# Altium PCB TYPEC_4KRECEIVER-v1.0.PcbDoc (part 11 of 12)
Units mil, origin at the board's own origin, x right, y up, seen from the top; angles counter-clockwise.
Board outline 2834.7 x 1259.84 mil, 10 copper layers (Top Layer, GND-1, Signal L1, GND-2, PWR-1, PWR-2, GND-3, Signal L2, GND-4, Bottom Layer), stack 61.686 mil thick; 492 components, 339 nets, 2214 pads, 1169 vias.
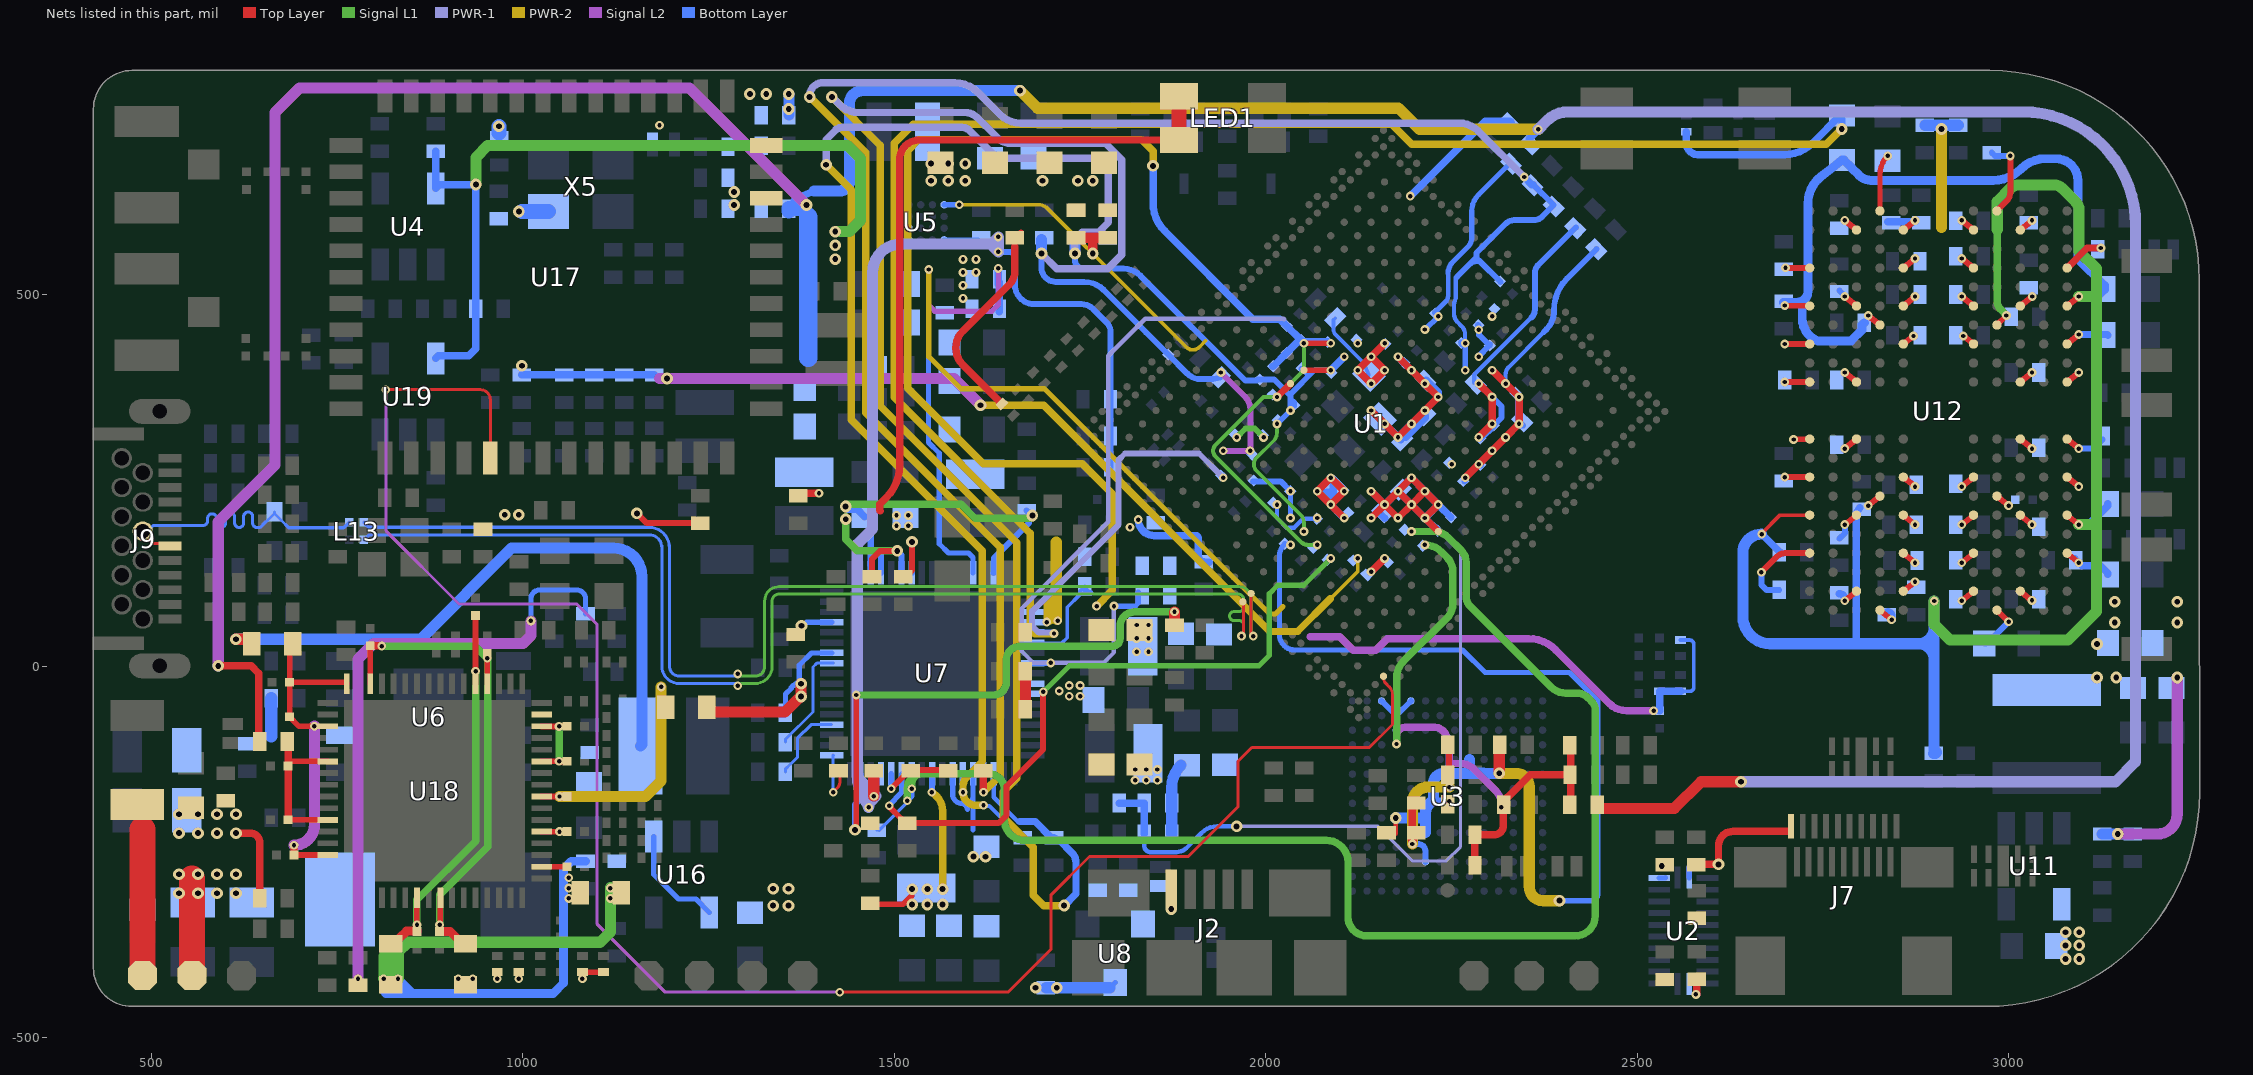
[diagram p16: the nets of this part, all layers, seen from the top]

## Via types
v1: diameter 11.81, hole 5.91, Top Layer to Bottom Layer, tented both sides, 698 vias
v2: diameter 15.75, hole 7.87, Top Layer to Bottom Layer, tented both sides, 248 vias
v3: diameter 11.81, hole 5.91, Top Layer to Signal L1, tented both sides, 121 vias
v4: diameter 11.81, hole 5.91, Top Layer to Bottom Layer, 44 vias
v5: diameter 11.81, hole 5.91, Signal L2 to Bottom Layer, 41 vias
v6: diameter 11.81, hole 5.91, Top Layer to Signal L1, 17 vias

## Nets (pads, with @x,y where several pads share a name; then routed paths per layer and width w, separated by ;. In a path a pad name is that pad's centre, name@x,y a point inside that pad or via, vN(x,y) a via of type N, cw(c..) or ccw(c..) an arc to the next point about the centre after c; other vN are vias at no path point) (continued)
USB_D_P: D29.1 J9.A6 J9.B6 L13.4 | length 435
  Top Layer w4.1: J9.B6@488.73,181.29 488.73,179.08 502.85,164.96 524,164.96 J9.A6@527.36,161.61
  Bottom Layer w4.1: J9.B6@488.73,181.29 495.24,181.29 503.26,189.31 567.98,189.31 570.03,189.31 ccw(c570.03,195.36) 576.08,195.36 576.08,198.83 cw(c582.13,198.83) 588.18,198.83 588.18,192.49 ccw(c594.23,192.49) 600.28,192.49 600.28,200.47 cw(c606.33,200.47) 612.38,200.47 612.38,192.49 ccw(c618.43,192.49) 624.48,192.49 624.48,201.3 cw(c630.53,201.3) 636.58,201.3 636.58,192.49 636.79,190.9 ccw(c642.63,192.49) 642.63,186.44 646.71,186.44 653.73,193.46 656.85,196.58 657.18,196.58 D29.1@665.96,205.36 ; D29.1@665.96,207.53 D29.1@665.96,205.36 ; L13.4@766.55,193.49 759.17,186.11 685.29,186.11 674.81,196.58 674.74,196.58 D29.1@665.96,205.36
USB_OTG0_D_N: L13.1 U1.R38 | length 1610
  Top Layer w4.1: v3(1967.54,40.27) ccw(c1967.54,43.18) 1968.54,40.45 ccw(c1967.54,43.18) 1970.44,43.18 1970.44,85.41 U1.R38@1969.44,86.41
  Signal L1 w4: v4(1289.66,-26.43) cw(c1292.56,-26.43) 1292.56,-23.53 1313.27,-23.53 ccw(c1313.27,-1.12) 1335.68,-1.12 1335.68,87.29 cw(c1345.21,87.29) 1345.21,96.82 1963.04,96.82 cw(c1963.04,89.42) 1970.44,89.42 1970.44,79.33 cw(c1964.39,79.33) 1964.39,73.28 1957.6,73.28 ccw(c1957.6,67.23) 1957.6,61.18 1964.39,61.18 cw(c1964.39,55.13) 1970.44,55.13 1970.44,43.18 cw(c1967.54,43.18) v3(1967.54,40.27)
  Bottom Layer w4.1: L13.1@786.24,169.87 790.1,173.73 790.86,173.73 793.77,176.63 1169.43,176.63 cw(c1169.43,172.53) 1169.71,176.62 1172.67,176.44 cw(c1172.42,172.35) 1173.08,176.4 cw(c1170.25,159.42) 1187.2,162.36 cw(c1183.16,161.64) 1187.26,161.9 1187.45,158.88 cw(c1183.35,158.63) 1187.45,158.63 1187.45,5.33 ; 1187.45,4.97 1187.45,-0.19 ccw(c1210.84,-0.19) 1210.84,-23.58 1286.8,-23.58 cw(c1286.8,-26.43) v4(1289.66,-26.43)
USB_OTG0_D_P: L13.2 U1.R37 | length 1610.1
  Top Layer w4.1: U1.R37@1980.58,97.55 1980.58,43.04 ccw(c1983.35,43.04) v3(1983.35,40.27)
  Signal L1 w4: v4(1289.66,-10.62) ccw(c1292.56,-10.62) 1292.56,-13.53 1313.27,-13.53 ccw(c1313.27,-1.12) 1325.68,-1.12 1325.68,87.29 cw(c1345.21,87.29) 1345.21,106.82 1964.33,106.82 cw(c1964.33,90.71) 1980.44,90.71 1980.44,43.18 ccw(c1983.35,43.18) v3(1983.35,40.27)
  Bottom Layer w4.1: L13.2@786.24,193.49 790.1,189.64 790.1,189.13 792.5,186.73 1169.43,186.73 cw(c1169.43,172.53) 1170.35,186.7 1173.29,186.52 cw(c1172.42,172.35) 1174.72,186.36 cw(c1170.25,159.42) 1197.15,164.1 cw(c1183.16,161.64) 1197.34,162.53 1197.53,159.51 cw(c1183.35,158.63) 1197.55,158.63 1197.55,-0.19 ccw(c1210.84,-0.19) 1210.84,-13.48 1286.8,-13.48 ccw(c1286.8,-10.62) v4(1289.66,-10.62)
VCC0V6_DDR: C109.2 C111.2 C113.2 C115.2 C117.2 C179.2 C198.2 C200.2 C202.2 C205.1 C207.2 C209.2 C211.2 C213.2 C215.2 C218.2 C221.2 C223.2 C225.2 C227.2 C229.2 C233.2 C237.2 C242.2 C249.2 C250.2 C254.2 C255.2 C256.2 C300.2 L10.2 R98.1 R100.2 R102.2 R103.2 U1.1E6 U1.1E7 U1.1E9 U1.1F5 U1.1G5 U12.AA3 U12.AA5 U12.AA8 U12.AA10 U12.B3 U12.B5 U12.B8 U12.B10 U12.D1 U12.D5 U12.D8 U12.D12 U12.F3 U12.F10 U12.U3 U12.U10 U12.W1 U12.W5 U12.W8 U12.W12 | length 1639.8
  Top Layer w8: v1(2667.36,126.31) 2688.55,147.5 cw(c2699.16,136.9) 2699.16,151.9 U12.W1@2732.35,151.9 ; v1(2699.72,536.05) 2699.87,535.91 2732.21,535.91 U12.D1@2732.35,535.76 ; v1(2779.6,87.92) U12.AA3@2795.34,100.72 ; v1(2779.6,190.28) U12.U3@2795.35,203.08 ; v1(2779.6,497.37) U12.F3@2795.34,484.58 ; v1(2779.6,599.73) U12.B3@2795.34,586.94 ; U12.AA5@2858.34,100.72 v1(2874.09,113.49) ; U12.W5@2858.34,151.9 v1(2874.09,139.1) ; U12.D5@2858.34,535.76 v1(2874.09,548.51) ; U12.B5@2858.34,586.94 v1(2874.09,599.73) ; v1(2937.08,87.92) U12.AA8@2952.82,100.72 ; v1(2937.08,139.1) U12.W8@2952.82,151.9 ; v1(2937.08,548.55) U12.D8@2952.82,535.76 ; v1(2937.08,599.73) U12.B8@2952.82,586.94 ; U12.AA10@3015.82,100.72 v1@3031.15,88.26 ; U12.U10@3015.82,203.08 v1(3031.57,190.28) ; U12.F10@3015.82,484.58 v1@3031.57,497.37 ; U12.B10@3015.82,586.94 v1(3031.57,599.73) ; U12.W12@3078.81,151.9 v1(3094.56,139.1)
  Top Layer w10: v1(2286.8,307.73) 2300.5,321.43 ccw(c2289.9,332.04) U1.1E6@2303.76,326.3 ; v1(2286.8,380.11) v1(2304.9,362.02) ; U1.1E6@2304.05,326.18 2304.74,326.18 2305.24,326.68 U1.1F5@2305.24,361.68 ; U12.D12@3078.81,535.76 3105.64,562.58 v1(3124.31,562.58)
  PWR-2 w15: 2909.86,590.4 v2(2909.86,722.86)
  Signal L2 w15: v2(3146.9,-226.14) 3199.96,-226.14 ccw(c3200.01,-199.16) 3226.98,-199.77 3226.98,-199.64 v2(3226.98,-15.49)
  Bottom Layer w5.7: C115.2@2280.68,392.04 2357.96,469.32
  Bottom Layer w6: C115.2@2280.68,381.04 C115.2@2280.68,391.44
  Bottom Layer w8: v1(2286.8,380.11) 2317.5,349.41 2317.5,334.37 C109.2@2308.95,325.83 ; v1(2304.9,325.83) C109.2@2308.95,325.83 ; C109.2@2308.59,325.46 C109.2@2308.95,325.83 ; 2357.96,469.32 2358.39,469.75 ccw(c2348.8,479.33) 2362.36,479.33 2362.36,528.81 cw(c2377.36,528.81) 2366.74,539.41 C117.2@2417.81,590.48 ; v1(2667.36,126.31) 2667.36,109.27 2674.1,102.53 C202.2@2691.36,102.53 ; C207.2@2772.36,171.27 2779.86,178.77 2779.86,190.03 v1(2779.6,190.28) ; C229.2@2772.36,505.49 2779.6,498.24 v1(2779.6,497.37)
  Bottom Layer w10: v1(2286.8,307.73) C111.2@2290.57,307.73 ; C111.2@2289.85,307.01 C111.2@2290.57,307.73 ; C109.2@2305.63,324.1 C109.2@2305.98,324.1 ; C109.2@2306.3,324.42 2306.46,324.27 2306.46,323.62 C111.2@2290.57,307.73 ; C237.2@2772.36,97.07 cw(c2772.36,89.82) 2779.6,89.82 v1(2779.6,87.92) ; C227.2@2837.36,597.99 2872.34,597.99 v1(2874.09,599.73) ; C221.2@3088.81,144.66 C221.2@3095.18,138.29 ; v1(3094.56,139.1) C221.2@3095.05,139.1 ; C221.2@3099.02,135.13 3123.66,135.13 3133.66,125.13 C255.2@3133.66,123.3
  Bottom Layer w15: R103.2@2887.36,727.86 R102.2@2932.36,727.86 ; C254.2@3126.19,-226.07 R100.2@3167.35,-226.06
  other v1: 3031.57,88.3 2250.61,271.54 3031.97,497.37
  other v2: 3118.98,-15.49 3144.98,-15.49 3226.98,58.51 3226.98,86.51
VCC1V8_DDR: C230.2 C231.2 C234.2 C235.2 C239.2 C240.2 C243.2 C244.2 R99.2 R104.2 U12.F1 U12.F12 U12.G4 U12.G9 U12.T4 U12.T9 U12.U1 U12.U12 | length 3251.2
  Top Layer w5: v1(2667.76,177.49) 2667.76,178.44 2692.4,203.08 U12.U1@2732.36,203.08
  Top Layer w8: v1(2698.81,485.23) 2699.14,484.9 2732.03,484.9 U12.F1@2732.35,484.58 ; v1(2811.1,215.87) U12.T4@2826.84,228.67 ; v1(2811.1,471.78) U12.G4@2826.84,458.99 ; U12.T9@2984.32,228.67 v1(3000.07,215.87) ; U12.G9@2984.32,458.99 v1(2997.16,471.78) ; U12.U12@3078.81,203.08 v1(3094.56,190.28) ; U12.F12@3078.81,484.58 v1(3094.56,497.37)
  Signal L1 w10: 2984.86,587.4 2984.86,490.71 ccw(c2999.86,490.71) 2989.24,480.11 2997.16,472.19 v1(2997.16,471.78)
  Signal L1 w15: v1(2899.86,87.53) 2899.86,56.26 2921.02,35.1 3079.93,35.1 3118.16,73.34 3118.16,190.28 ; 2984.86,587.4 2984.86,625.03 3002.97,643.14 cw(c3013.57,632.53) 3013.57,647.53 3061.14,647.53 cw(c3061.14,632.53) 3071.74,643.14 3090.47,624.42 cw(c3079.86,613.82) 3094.86,613.82 3094.86,558.09 3118.16,534.78 3118.16,497.37 ; v1(3094.56,190.28) 3118.16,190.28 ; v1(3094.56,497.37) 3118.16,497.37 ; 3118.16,190.28 3118.16,497.37
  Bottom Layer w8: v1@2667.36,177.49 v1@2668.16,177.49
  Bottom Layer w10: v1@2668.16,177.49 C235.2@2692.82,152.83 ; 2793.14,30.03 2794.86,31.74 2794.86,200.72 cw(c2811.93,200.72) C243.2@2799.86,212.79 ; v1(3094.56,190.28) 3106.97,190.28 3122.47,205.78 3123.66,205.78 3133.66,215.78 C230.2@3133.66,218.28
  Bottom Layer w12: C240.2@2697.36,489.53 C240.2@2698.81,489.53 ; v1(2698.81,485.23) C240.2@2698.81,489.53 ; 2722.36,489.53 2722.36,468.11 ccw(c2755.35,468.11) 2743.2,437.44 2787.77,437.44 2802.86,452.52 2802.86,459.03 C244.2@2805.86,462.03 ; R104.2@2775.86,681.03 2763.36,671.03 2747.66,658.85 ccw(c2775.86,622.5) 2729.86,622.5 2729.86,503.93 cw(c2715.46,503.93) 2715.46,489.53 C240.2@2698.81,489.53 ; R104.2@2778.36,681.03 2788.36,671.03 2788.36,670.8 2798.88,660.28 ccw(c2814.86,676.26) 2814.86,653.66 2979.34,653.66 ccw(c2979.34,706.59) 3016.76,669.17 cw(c3049.52,636.41) 3049.52,682.73 3063.98,682.73 cw(c3063.98,653.4) 3084.7,674.16 ; 3084.72,674.14 cw(c3063.98,653.4) 3093.32,653.4 3093.32,547.98 3129.17,512.13 C231.2@3129.17,507.52 ; v1(3094.56,497.37) 3112.8,497.37 ccw(c3112.8,512.37) 3123.41,501.76 C231.2@3129.17,507.52 ; C231.2@3129.17,506.99 C231.2@3129.17,507.52 ; C231.2@3129.21,507.57 C231.2@3129.17,507.52
  Bottom Layer w15: v1@2667.36,177.49 ccw(c2667.36,152.49) 2642.36,152.49 2642.36,66.96 ccw(c2679.29,66.96) 2679.29,30.03 2793.14,30.03 2878.64,30.03 ; R99.2@2899.07,-117.63 2901.36,-117.63 R99.2@2902.86,-116.13 ; R99.2@2899.86,-116.13 2899.86,8.82 ; v1(2899.86,87.53) 2899.86,51.24 ; 2878.64,30.03 cw(c2878.64,8.82) 2899.86,8.82 ; 2878.64,30.03 ccw(c2878.64,51.24) 2899.86,51.24 ; 2899.86,8.82 2899.86,51.24
VCC3V3_PMU: C20.2 C118.2 C123.2 R6.1 R7.1 R12.2 R22.1 R109.1 U1.1N15 U1.1P16 U7.31 | length 1774.4
  Top Layer w8: R12.2@1661.09,575.24 R12.2@1662.36,576.53 ; R12.2@1662.36,576.53 1665.86,576.53 1670.86,581.53 R12.2@1670.86,583.76
  Top Layer w10: R22.1@1645.16,352.77 1592.48,405.44 cw(c1615.31,428.27) 1583.03,428.27 cw(c1614.68,428.27) 1592.28,450.63 1655.08,513.44 ccw(c1637.14,531.36) 1662.51,531.36 1662.51,563.88 1662.36,564.03
  Top Layer w15: v1@1472.68,-175 C20.2@1472.68,-140.76
  Signal L1 w8: v1(1961.09,307.73) 1972.96,319.6 1985.41,319.6 v1(1997.28,307.73)
  PWR-1 w15: v1@1463.73,-185.34 cw(c1510.41,-147.77) 1450.48,-147.77 ; v1(1465.73,-190.34) cw(c1477.88,-190.34) 1469.28,-181.75 ; 1469.29,-181.74 1475.86,-175.17 1460.27,-159.59 1451.92,-151.24 cw(c1455.39,-147.77) 1450.48,-147.77 ; 1632.36,565.49 v1(1640.32,557.53) v1@1640.32,575.07 ; 1632.36,568.03 1509.52,568.03 ccw(c1509.52,529.61) 1471.11,529.61 1471.11,184.6 1450.48,163.97 1450.48,-147.77 ; 1632.36,569.57 v1(1640.32,577.53)
  Bottom Layer w8: v1(1640.32,557.53) 1654.21,557.53 cw(c1654.21,549.23) 1662.51,549.23 1662.51,513.5 1662.51,513.44 ccw(c1689.14,513.44) 1675.75,490.41 ccw(c1688.24,511.9) 1688.24,487.05 1752.32,487.05 cw(c1752.32,465.64) 1767.46,480.78 ; 1767.49,480.74 1786,462.24 ; 1786.02,462.22 cw(c1773.5,449.73) 1791.18,449.73 R109.1@1791.18,358.97 R7.1@1791.18,309.58 R6.1@1791.18,267.26
  other v1: 1472.86,-175.17
VCC3V3_SD: C25.2 U7.58 | length 90.9
  Top Layer w8: C25.2@1512.35,120.1 1515.85,120.1 1524.11,128.35 v2(1524.11,167.08)
  Bottom Layer w8: U7.58@1523.71,125.27 1523.91,125.47 1523.91,161.88 v2@1524.11,162.08
VCC3V3_SYS: C8.2 C14.2 C18.2 C22.2 C26.2 C30.2 C32.2 C65.1 C66.1 C67.2 C68.2 C81.2 C82.2 C196.2 C290.2 FB7.1 FB8.1 L12.2 LED1.2 LED1.4 R32.1 R112.2 R119.2 R121.2 R132.1 TP7.1 U7.4 U7.10 U7.11 U7.22 U7.24 U7.30 U7.45 U7.54 U7.57 U7.66 U11.4 U16.1 U16.4 | length 3438.4
  Top Layer w7: R121.2@1080.45,-412.12 R112.2@1109.06,-412.12
  Top Layer w8: C22.2@1470.43,120.26 1470.43,144.28 1481.15,155 v2(1504.24,155) ; v1@1496.07,-164.83 1514.18,-146.72 1514.18,-145.76 1520.04,-139.9 C14.2@1575.63,-139.9
  Top Layer w10: 1481.18,208.66 1480.51,209.34 1480.51,217.62 1489.46,226.57 ccw(c1446.27,269.76) 1507.35,269.76 1507.35,681.05 cw(c1534.3,681.05) 1534.3,708 LED1.2@1883.6,708
  Top Layer w15: FB7.1@1248,-55.58 1254.48,-62.06 1352.95,-62.06 v2@1373.86,-41.15 ; FB7.1@1252.31,-53.27 FB7.1@1252.31,-47.89 ; v2@1374.83,-41.15 v2(1374.83,-23.84)
  Top Layer w20: LED1.2@1883.6,708 LED1.4@1883.6,767.06
  Top Layer w35: TP7.1@555.11,-416.63 555.11,-285.89
  Signal L1 w10: v2@1434.79,200.61 1434.79,170.86 1450.65,155 v2(1504.24,155) v2@1505.4,155 ; v2@1434.79,217.62 1590.33,217.62 1608.84,199.11 v2@1684.62,199.11
  PWR-2 w15: v1@1708.47,62.41 1708.47,81.65 1717.8,90.98 1717.8,91.33 ; v1@1718.15,63.26 1718.15,90.98 1718.15,166.58
  Signal L2 w15: v4(778.4,-420.79) 778.4,9.58 799.16,30.34 1000.53,30.34 1011.1,40.91 v5(1011.1,60.7)
  Bottom Layer w7: v5(1011.1,60.7) 1011.1,90.33 cw(c1023.02,90.33) 1023.02,102.25 1072.91,102.25 cw(c1072.91,90.56) 1084.6,90.56 R32.1@1084.6,70.31 ; U16.1@1176.49,-229.41 1176.49,-280.55 1209.61,-313.67 1233.19,-313.67 U16.4@1251.29,-331.77 ; C32.2@1353.68,-62.77 1353.68,-37.88 1361.47,-30.09 1361.47,-28.95 1363.99,-26.44 1365.13,-26.44 1372.26,-19.3 1372.26,1.05 1388.79,17.59 U7.45@1416.03,17.59 ; U7.24@1578.83,-145.21 1578.83,-157.95 1578.83,-172.6 ccw(c1591.25,-172.61) 1589.68,-184.93 ccw(c1590.4,-178.97) 1590.35,-184.97 1596.88,-184.97 ; 1596.92,-184.97 ccw(c1596.88,-175.46) 1606.39,-175.46 ; 1598.68,-193.3 ccw(c1590.35,-193.3) 1590.4,-184.97 1606.39,-184.97 ; 1606.39,-220.37 1606.39,-184.97 ; U7.22@1606.39,-145.21 1606.39,-184.97
  Bottom Layer w7.5: U7.54@1468.59,138.44 U7.54@1468.59,125.27 U7.54@1468.77,125.45
  Bottom Layer w8: v1(1496.15,-165.25) U7.30@1496.15,-145.21 ; v2(1504.24,155) 1509.93,149.31 U7.57@1509.93,125.27 ; U7.66@1633.95,125.27 1634.28,125.6 1634.28,145.16 1681.3,192.19 1681.3,204.03 1682.18,204.91 1682.55,204.91 C67.2@1678.42,209.03
  Bottom Layer w9: U7.54@1468.52,136.02 C30.2@1468.52,194.21
  Bottom Layer w10: v2@1434.79,212.62 1436.35,212.62 1437.89,211.07 1450.18,211.07 C30.2@1460.18,201.07
  other v1: 1735.85,-40.75 1750.35,-40.75 1722.25,-33.69 1735.85,-26.25 1750.35,-26.25 1705.6,59.05 1720.15,61.05
  other v2: 3076.8,-394.26 3095.08,-394.26 3076.8,-375.98 3095.08,-375.98 3076.8,-358.26 3095.08,-358.26 1337.14,-322.55 1357.73,-322.55 537.46,-305.83 563,-305.83 588.55,-305.83 614.09,-305.83 1337.14,-299.71 1357.73,-299.71 537.46,-280.28 563,-280.28 588.55,-280.28 614.09,-280.28 1606.63,-256.6 1623.05,-256.7 1374.89,-41.15 1434.84,197.61 1686.12,202.61 975.89,203.66 994.81,203.66 1434.79,214.62
  other v4: 913.39,-420.79 932.77,-420.79 994.83,-420.79 1080.45,-420.79
VCC5V0_SYS: C1.2 C9.2 C12.2 C38.1 C52.2 C79.2 C80.2 C85.2 C86.2 C164.2 C175.1 C186.2 F1.2 R5.2 R17.2 R38.2 R148.1 R152.1 TP1.1 U2.10 U4.5 U5.D1 U5.D2 U5.E1 U5.E2 U6.2 U7.33 U8.3 U19.5 | length 2335.3
  Top Layer w7: v2@1449.02,-218.84 v6(1449.02,-39.03)
  Top Layer w8: v2(1447.36,-220.51) ccw(c1447.36,-218.84) v2@1449.02,-218.84
  Top Layer w10: v2(614.09,-224.99) 633.48,-224.99 cw(c633.48,-237.6) 646.09,-237.6 R152.1@646.09,-308.84
  Top Layer w15: R17.2@1877.36,55.03 v3(1877.36,72.88)
  Top Layer w35: TP1.1@488.46,-416.63 488.46,-219.95
  Signal L1 w10: v6(1449.02,-39.03) 1633.97,-39.03 ccw(c1633.97,-21.95) 1651.05,-21.95 1651.05,8.33 cw(c1669.19,8.33) 1669.19,26.47 1793.53,26.47 ccw(c1793.53,37.13) 1804.18,37.13 1804.18,53.43 cw(c1823.63,53.43) 1823.63,72.88 v3(1877.36,72.88)
  Signal L1 w15: v2(937.02,648.02) 937.02,684.41 953.01,700.41 1437.49,700.41 1454.87,683.02 1454.87,599.76 1439.76,584.65 v2(1420.76,584.65)
  Bottom Layer w7: 659.61,-96.48 ccw(c659.61,-94.28) 661.81,-94.28 ; U8.3@1790.54,-433.08 U8.3@1797.65,-425.97 ; U2.10@2529.88,-285.41 2537.73,-285.41 U2.10@2538.17,-284.97
  Bottom Layer w8: v2@1447.49,-220.37 1447.49,-186.18 1454.81,-178.86 U7.33@1454.81,-145.21
  Bottom Layer w10: U19.5@883.03,413.99 886.41,417.36 927.43,417.36 937.02,426.95 C52.2@937.02,481.02 v2(937.02,648.02) 888.33,648.02 U4.5@883.03,642.73 C1.2@883.03,692.81
  Bottom Layer w15: C164.2@1704.38,-433.08 v2(1718.85,-433.08) U8.3@1790.54,-433.08
  Bottom Layer w17: 661.81,-94.28 R38.2@661.81,-43.28
  other v2: 1690.53,-433.08 2533.17,-269.01 537.46,-224.99 563,-224.99 588.55,-224.99 537.46,-199.45 563,-199.45 588.55,-199.45 614.09,-199.45 1420.76,547.65 1420.76,566.15
  other v4: 965.82,-420.79
VCC5V_HDMI: C189.1 J7.19 U2.12 | length 216.9
  Top Layer w10: C189.1@2579.65,-267.64 C189.1@2580.02,-268.01 ; C189.1@2580.02,-267.01 v2(2609.6,-267.01) 2609.6,-242.08 cw(c2629.12,-242.08) 2629.12,-222.56 J7.19@2705.23,-222.56
  Bottom Layer w8: U2.12@2570.23,-284.42 2570.23,-272.14 cw(c2574.92,-272.14) 2574.92,-267.45 v2@2610.41,-267.45
VCC5V_USB: C165.1 C166.2 D8.1 J2.1 U8.2 | length 0
  other v2: 1872.99,-327.18
VCC12_R: C54.2 C313.2 C319.2 C326.2 FB12.2 U18.2 U18.5 U18.11 U18.14 U18.15 | length 183.4
  Top Layer w5.6: C326.2@1059.56,-80.94 C326.2@1059.79,-80.72
  Top Layer w7.5: U18.2@1025.43,-270.14 C319.2@1059.79,-270.14 ; U18.5@1025.43,-222.9 v3(1049.61,-222.9) C313.2@1059.79,-222.89 ; U18.11@1025.43,-128.41 v3@1048.77,-128.41
  Top Layer w8: U18.14@1025.43,-81.17 v3@1049.52,-81.17 ; v3@1049.08,-128.61 C54.2@1059.28,-128.61 ; v3@1049.61,-80.94 C326.2@1059.56,-80.94
  Signal L1 w10: v3(1049.08,-128.1) v3(1049.08,-81.26)
  other v3: 1061.94,-312.77 1061.94,-298.96 1061.94,-285.15
VCC12_T: C55.2 C146.2 C325.2 FB13.2 U18.32 U18.35 U18.46 | length 452.3
  Top Layer w7.5: C325.2@692.33,-254.39 U18.46@737.43,-254.39 ; FB13.2@695.37,29.74 695.37,25.8 686.33,16.76 C55.2@686.33,-22.01 ; v4(719.79,-81.17) 699.22,-81.17 C146.2@686.33,-68.28 C55.2@686.33,-22.01 ; U18.32@763.32,-23.77 761.56,-22.01 C55.2@686.33,-22.01
  Top Layer w10: C325.2@692.33,-254.39 v4(692.3,-241.24)
  Signal L2 w15: v4(692.3,-241.24) ccw(c692.3,-213.74) 719.79,-213.74 v4(719.79,-81.17)
VCC18_T: C312.2 C317.2 R126.2 U18.38 U18.43 | length 209.1
  Top Layer w7.5: R126.2@683.01,-101.6 R126.2@684.35,-102.93 ; C312.2@684.35,-205.03 686.39,-207.08 737.37,-207.08 U18.43@737.43,-207.15 ; 686.33,-128.41 U18.38@737.43,-128.41
  Top Layer w10: C312.2@684.35,-205.03 R126.2@684.35,-102.93
VCC33_IO: C310.2 C315.2 C316.2 FB8.2 U18.20 U18.30 U18.57 | length 729.4
  Top Layer w4: C310.2@888.3,-357.42 C310.2@889.3,-357.42 ; C315.2@951.45,17.14 C315.2@952.3,16.28
  Top Layer w7.5: U18.30@794.82,-23.77 C316.2@794.83,27.14 ; C310.2@888.47,-357.26 v1@888.47,-348.47 ; v1@889.3,-348.23 U18.57@889.3,-311.77 ; FB8.2@911,-365.8 915.02,-365.8 FB8.2@923.08,-373.86 ; U18.20@952.3,-23.78 C315.2@952.3,16.28
  Top Layer w10: C316.2@794.83,27.14 v3@810.49,27.14
  Top Layer w12: C310.2@888.39,-357.33 902.53,-357.33 FB8.2@911,-365.8
  Signal L1 w10: v3(810.49,26.78) 936.2,26.78 v3(952.37,10.6) ; v1(888.29,-348.23) 888.29,-307.64 952.9,-243.03 952.9,8.79 952.71,8.98 952.71,9.88 v3@952.9,10.07
VCC33_R: C314.2 FB7.2 U18.8 | length 306.4
  Top Layer w7.5: U18.8@1025.43,-175.65 C314.2@1059.79,-175.65
  PWR-2 w15: v1(1049.61,-175.61) 1165.61,-175.61 1186.45,-154.77 v4(1186.45,-28.15)
VCC_1P8A: C43.1 U7.44 | length 146.1
  Bottom Layer w4.1: C43.1@1353.68,-102.47 1353.68,-98.97 1390.79,-61.87 1390.79,-1.34 1395.94,3.81 U7.44@1418.21,3.81
VCC_1P8D: C42.1 U7.48 | length 56.9
  Top Layer w7: C42.1@1375.3,39.98 v2(1375.3,54.26)
  Bottom Layer w7: v2(1375.3,54.26) 1377.67,54.26 1382.34,58.93 U7.48@1416.03,58.93
VCC_1V2: C287.2 C292.2 C293.2 FB11.1 FB12.1 FB13.1 L11.2 R118.2 | length 1940.9
  Top Layer w15: v2(614.01,35.95) FB13.1@635.94,35.95
  Signal L1 w15: v4(812.87,-420.79) 822.56,-420.79 ; v4@813.3,-420.37 813.3,-390.69 817.34,-386.66 ; 817.45,-386.66 827.14,-376.97 832.25,-371.85 ; 822.56,-391.77 822.56,-420.79 ; 832.25,-385.08 845.48,-371.85 ; v3@1118.1,-298.42 1118.1,-357.87 1104.12,-371.85 845.48,-371.85 ; 822.56,-420.79 v4(832.25,-420.79) 832.67,-420.38 832.67,-371.85 845.48,-371.85
  Bottom Layer w10: 811.36,-412.87 811.36,-437.17 815.93,-441.73 842.12,-441.73 832.91,-432.52 ; 811.94,-427.3 830.91,-427.3 ; 832.91,-427.3 832.91,-412.87 ; 1137.77,-176.6 ccw(c1139.5,-176.6) 1139.5,-178.33
  Bottom Layer w12: 832.14,-439.99 832.92,-440.77 852.23,-440.77 ; v4(832.25,-420.79) 852.23,-440.77 ; R118.2@1084.6,-262.77 1065.49,-262.77 1055.04,-273.22 1055.04,-426.68 1040.95,-440.77 852.23,-440.77
  Bottom Layer w15: v2@617.26,35.95 862.63,35.95 985.31,158.63 1122.48,158.63 cw(c1122.48,120.52) 1160.59,120.52 1160.59,-105.82 L11.2@1158.61,-107.79
  other v3: 1118.18,-312.77 1118.18,-298.96
VCC_1V8: C28.2 C29.2 L5.2 R3.2 R87.1 R93.2 R126.1 R140.1 | length 5504
  Top Layer w10: v2(590.26,0.19) 634.67,0.19 644.57,-9.71 644.57,-100.16 R126.1@646.01,-101.6 ; R3.2@1371.18,232.38 v1(1398.9,232.38)
  Top Layer w15: R87.1@2446.35,-187.01 2446.35,-190.21 2447.85,-191.71 2550.02,-191.71 2585.91,-155.81 v2(2639.89,-155.81)
  PWR-1 w15: v1(2367.05,722.46) 2378.77,734.18 cw(c2407.05,705.89) 2407.05,745.89 3018.69,745.89 cw(c3018.69,593.5) 3171.08,593.5 3171.08,-128.78 3144.05,-155.81 v2(2639.89,-155.81)
  PWR-2 w15: v2(1669.56,774.45) 1693.22,750.79 2178.6,750.79 2206.93,722.46 v1(2367.05,722.46)
  Signal L2 w15: v2(590.26,0.19) 590.26,193.93 666.93,270.6 666.93,745.1 699.93,778.11 1224.54,778.11 v2(1382.2,620.44)
  Bottom Layer w10: 1370.62,629.73 1392.36,639.57 ; R93.2@2356.44,702.11 2354.64,703.91 2354.64,709.56 2367.05,721.97 v1(2367.05,722.46)
  Bottom Layer w15: 1392.36,639.57 1427.41,639.57 ccw(c1427.41,652.12) 1439.95,652.12 1439.95,757.04 cw(c1457.36,757.04) 1457.36,774.45 v2(1669.56,774.45)
  Bottom Layer w20: R140.1@1358.12,612.14 R140.1@1358.12,615.64 1372.12,615.64
  Bottom Layer w25: 1372.12,619.42 1372.12,622.85 ; 1384.2,415.03 1384.2,604.34
VCC_3V3: C27.2 C137.2 C147.2 C176.2 C181.2 C188.2 C190.2 C191.2 R29.2 R50.1 R76.2 R77.2 U1.1H18 U1.1J2 U1.1N8 U2.23 U3.E6 U3.F5 U3.J10 U3.K9 U7.55 | length 1694.6
  Top Layer w6: v2(2175.2,-204.5) 2175.2,-225.47 2175.43,-225.69
  Top Layer w10: v1@2580.07,-441.89 R77.2@2580.07,-424.19
  Top Layer w15: v2(2314.43,-144.45) 2314.58,-144.3 2314.58,-105.6 C191.2@2315.35,-104.83
  PWR-2 w15: v2@2316.43,-144.45 2336.96,-144.45 cw(c2336.96,-162.27) 2354.78,-162.27 2354.78,-296.91 ccw(c2373.85,-296.91) 2365.9,-314.24 ccw(c2373.85,-296.91) 2373.85,-315.98 v2@2395.36,-315.98
  Bottom Layer w7: C181.2@2025.71,164.61 ccw(c2042.99,147.33) 2018.55,147.33 2018.55,42.27 ccw(c2039.23,42.27) 2039.23,21.6 2265.09,21.6 2295.6,-8.91 2409.06,-8.91 2447.35,-47.2 2447.35,-306.38 cw(c2437.91,-306.38) 2437.91,-315.82 v2(2395.51,-315.82)
  Bottom Layer w8: U7.55@1482.37,125.27 1482.37,148.62 ; 2273.99,-144.41 ccw(c2270.53,-142.72) 2274.38,-142.72
  Bottom Layer w10: R50.1@1358.12,741.18 R50.1@1358.4,741.47 ; v2@1358.4,769.69 v2@1358.69,769.98 ; v1@2194.85,632.27 v1(2194.85,632.53) 2295.41,733.08 2325.46,733.08 R29.2@2327.94,730.61 ; 2214.62,-204.5 2215.33,-205.21 ; 2223.77,-181.98 v1(2247.36,-181.98)
  Bottom Layer w15: R50.1@1358.4,741.47 v2@1358.4,769.69 ; v2(2175.2,-204.5) U3.F5@2195.64,-204.5 2214.62,-204.5 ; U3.E6@2215.33,-224.19 2215.33,-205.21 2215.33,-196.63 cw(c2230.33,-196.63) 2219.72,-186.03 2223.77,-181.98 ; 2225.77,-178.98 2225.77,-158.61 cw(c2239.93,-158.61) 2239.93,-144.45 2273.25,-144.45 ; 2273.68,-144.41 2273.99,-144.41 U3.J10@2293.03,-144.41 ; 2274.38,-142.72 U3.K9@2274.38,-125.76 ; U3.J10@2295.07,-144.45 v2(2314.43,-144.45) ; R29.2@2327.94,730.61 R29.2@2328.35,730.61
  other v1: 2579.21,-441.99 2033.47,162.97 1503.23,188.62 1519.27,188.62 1503.23,202.71 1519.27,202.71 2123.94,434.4 2304.9,470.59
  other v2: 1358.12,749.68 1358.12,769.98
VCC_CPVDD: C40.1 U7.38 | length 105.8
  Bottom Layer w4.1: C40.1@1353.68,-142.47 1353.68,-138.97 1360.63,-132.02 1360.95,-132.02 1369.79,-123.18 1369.79,-97.4 1388.32,-78.87 U7.38@1416.03,-78.87
VCC_CPVSS: C41.2 U7.35 | length 84.3
  Top Layer w4.1: v1(1417.97,-169.97) 1422.96,-164.98 ccw(c1412.36,-154.37) 1427.36,-154.37 C41.2@1427.36,-139.3
  Bottom Layer w4: v1(1417.97,-169.97) 1417.97,-119.97 U7.35@1418.21,-120.21
VCC_DDR: C71.2 C73.2 C108.2 C110.2 C112.2 C114.2 C116.2 C178.2 C197.2 C199.2 C201.2 C204.1 C206.2 C208.2 C210.2 C212.2 C214.2 C217.2 C220.2 C228.2 C232.2 C236.2 C241.2 C245.2 C246.2 C247.2 C248.2 L7.1 R25.2 R40.2 R98.2 U1.1D5 U1.1D6 U1.1D7 U1.1D8 U1.1D9 U1.1E4 U1.1F4 U1.1G4 U7.26 U12.A4 U12.A9 U12.AB4 U12.AB9 U12.F5 U12.F8 U12.H1 U12.H5 U12.H8 U12.H12 U12.K1 U12.K3 U12.K10 U12.K12 U12.N1 U12.N3 U12.N10 U12.N12 U12.R1 U12.R5 U12.R8 U12.R12 U12.U5 U12.U8 | length 1654.1
  Top Layer w7: U12.A4@2826.84,612.53 2826.84,661.11 cw(c2862.73,661.15) v1(2837.36,686.53)
  Top Layer w8: R25.2@1468,-319.37 1469.33,-320.7 1512.04,-320.7 1523.54,-309.2 ; v1(2698.81,254.26) U12.R1@2732.35,254.26 ; v1(2698.81,382.21) U12.K1@2732.35,382.22 ; v1(2698.81,433.39) U12.H1@2732.35,433.4 ; v1(2710.63,304.9) 2710.91,305.17 2732.08,305.17 U12.N1@2732.35,305.44 ; v1(2779.6,292.65) U12.N3@2795.34,305.44 ; v1(2779.6,395.01) U12.K3@2795.34,382.22 ; U12.AB4@2826.84,75.13 v1(2842.59,62.33) ; U12.U5@2858.34,203.08 v1(2874.09,190.28) ; U12.R5@2858.34,254.26 v1(2874.09,241.46) ; U12.H5@2858.34,433.4 v1@2871.9,444.42 ; U12.F5@2858.34,484.58 v1(2874.09,497.37) ; v1(2937.08,190.28) U12.U8@2952.82,203.08 ; v1(2937.08,241.46) U12.R8@2952.82,254.26 ; v1(2937.08,497.37) U12.F8@2952.82,484.58 ; v1@2939.26,444.41 U12.H8@2952.82,433.4 ; U12.AB9@2984.32,75.13 2984.49,75.13 2999.91,59.71 v1(3000.07,59.71) ; U12.A9@2984.32,612.53 2984.32,612.91 2997.7,626.29 ccw(c2986.46,637.53) 3002.36,637.53 v1(3002.36,686.53) ; U12.N10@3015.82,305.44 v1(3031.57,292.64) ; U12.R12@3078.81,254.26 v1(3094.56,241.46) ; U12.N12@3078.81,305.44 v1(3094.56,292.64) ; U12.H12@3078.81,433.4 v1(3094.56,446.19) ; U12.K10@3015.82,382.22 v1(3031.57,395.01) U12.K10@3015.82,382.22 ; U12.K12@3078.81,382.22 v1(3094.56,395.01) U12.K12@3078.81,382.22
  Top Layer w10: v1(2268.71,253.44) v1(2286.8,271.54) v1(2304.9,289.64) v1(2322.99,307.73) v1(2341.09,325.83) ; v1(2304.9,398.21) v1(2322.99,380.11) v1(2341.09,362.02) ; U1.1D5@2341.44,326.21 U1.1D5@2341.44,327.48 ; U1.1E4@2341.44,361.16 U1.1E4@2341.44,361.63 ; U1.1D5@2341.46,327.5 U1.1E4@2341.46,361.15
  PWR-2 w10: v1(1550.77,-169.97) 1556.21,-174.4 cw(c1549.89,-182.15) 1556.99,-175.11 cw(c1536.8,-195.27) 1565.34,-195.27 ; v2(1565.34,-300.33) 1565.34,-195.32
  Bottom Layer w5.7: v1@2322.99,380.91 2322.99,392 cw(c2337.99,392) 2327.38,402.6 ; 2327.39,402.61 2374.41,449.64
  Bottom Layer w8: v1@1551.27,-169.47 U7.26@1551.27,-145.21 ; C112.2@2267.73,248.18 C112.2@2268.71,249.15 ; v1(2268.71,253.44) 2282.91,267.65 2283.08,267.65 C110.2@2286.89,271.46 ; C110.2@2289.72,270.16 2289.72,271.54 2289.72,274.46 v1(2322.99,307.73) 2338.86,323.6 2346.8,323.6 2339.72,330.68 2339.72,363.39 v1(2322.99,380.11) ; 2374.41,449.64 2378.21,453.43 ccw(c2354.03,477.61) 2386.75,467.66 ccw(c2356.96,476.72) 2388.04,478.55 cw(c2449,478.55) 2405.89,521.65 R40.2@2445.31,561.06 ; C197.2@2967.36,30.03 ccw(c2967.36,37.36) 2972.54,32.18 v1(3000.07,59.71) ; C220.2@2977.36,690.86 2981.83,686.39 v1@3001,686.39 ; v1(3094.56,292.64) 3094.68,292.53 3114.36,292.53 C214.2@3126.78,304.95
  Bottom Layer w10: C228.2@2837.36,72.99 cw(c2837.36,67.75) 2842.59,67.75 v1(2842.59,62.33) ; v1(3094.56,446.19) 3132.81,446.19 C201.2@3133.81,445.18
  other v1: 2872.09,444.19 2939.08,444.19
  other v2: 1524.25,-320.87 1544.79,-320.87 1565.34,-320.87 1524.25,-300.36 1544.79,-300.33 3118.98,29.51 3142.98,58.51 3142.98,86.51
VCC_WL: C3.2 C4.2 R50.2 U17.36
  other v2: 1305.82,769.98 1327.97,769.98
VCCA1V8_IMAGE: C24.2 C153.2 C161.2 C163.2 C168.2 C169.1 C172.2 C174.2 U1.1G17 U1.1P9 U1.1P12 U1.1P13 U1.1R10 U7.6 | length 2202.9
  Top Layer w7: v1(2051.56,434.4) v1(2087.75,434.4)
  Top Layer w10: v1(2015.38,362.01) U1.1P12@2033.47,380.11
  Signal L1 w5.5: 1932.39,282.22 1941.99,272.62 ; 1932.42,282.26 cw(c1939.94,289.78) 1932.42,297.29 1997.14,362.01 v1(2015.38,362.01) ; 1941.99,272.59 2047.53,167.06 ccw(c2057.35,176.83) 2057.3,162.97 v1(2069.66,162.97) ; v1@2015.38,362.5 2051.56,398.69 v1(2051.56,434.4)
  PWR-2 w10: v1(1772.56,80.6) 1793.68,101.73 1793.68,231.59 1753.25,272.02 1619.81,272.02 1518.21,373.62 1518.21,693.43 1533.43,708.65 1832.79,708.65 1848.55,692.89 v2(1848.55,673.21)
  Bottom Layer w5: U7.6@1686.51,30.37 1725.44,30.37 1733.11,38.04 1733.11,79.14 1750.18,96.21 1750.18,100.53 C24.2@1756.68,107.03
  Bottom Layer w8: C24.2@1756.79,105.03 1756.79,103.42 1761.68,98.53 C24.2@1764.22,98.53
  Bottom Layer w10: v2(1848.55,673.21) 1848.55,623.21 ccw(c1901.84,623.21) 1864.13,585.56 ; 1864.16,585.53 1982.91,466.78 2019.29,466.78 2028.4,457.68 C174.2@2028.5,457.68 ; C172.2@2009.6,403.19 2010.23,403.19 C169.1@2028.49,421.45 ; C169.1@2028.49,421.55 2043.22,436.29 2044.42,436.29 C168.2@2046.65,438.51 ; C174.2@2028.74,457.68 2047.28,439.14 C168.2@2046.65,438.51 ; C168.2@2047.93,436.5 C163.2@2083.61,436.5 ; C168.2@2047.93,437.23 C168.2@2046.65,438.51
VCCA1V8_PMU: C23.2 C120.1 C125.2 R82.1 R104.1 U1.1N18 U7.5 | length 2880.6
  Top Layer w15: C23.2@1676.68,-58.41 C120.1@1676.68,-7.27
  PWR-1 w8: v1@1713.15,44.77 1694.79,44.77 1685.88,53.68 1685.88,73.89 1802.29,190.3 1802.29,277.41 1810.85,285.98 1910.46,285.98 v1(1942.99,253.44)
  PWR-2 w10: v1@1715.15,43.45 1689.01,43.45 1683.15,49.31 1683.15,178.4 1499.95,361.6 1499.95,703.35 1525.6,729 2170.01,729 2196.99,702.01 2754.58,702.01 v2(2775.43,722.86)
  Bottom Layer w8: U7.5@1686.51,45.15 v1@1713.15,45.15
  Bottom Layer w10: R82.1@2566.2,719.08 2566.2,703.87 ccw(c2581.78,703.87) 2581.78,688.29 2698.54,688.29 ccw(c2698.54,741.6) 2736.22,703.89 ; 2736.23,703.91 2773.36,741.03 R104.1@2775.86,741.03 2775.86,722.86 v2(2775.43,722.86)
  other v1: 1715.15,43.77
VCCA_1V8: C21.2 C122.1 C127.2 C136.2 C140.2 C142.2 C145.2 C154.2 C155.2 R60.2 R61.1 R62.1 R63.1 U1.1D15 U1.1D16 U1.1H4 U1.1H16 U1.1J3 U1.1K17 U7.3 | length 1001.3
  Top Layer w10: v1(2142.04,126.78) v1(2160.14,144.87)
  Signal L2 w10: 2060.39,39.22 2099.94,39.22 2117.77,21.4 2148.21,21.4 2163.67,36.85 2353.68,36.85 cw(c2353.68,-15.64) 2390.79,21.49 2390.85,21.44 2462.86,-50.58 ccw(c2485.95,-27.47) 2485.95,-60.14 v1(2522.25,-60.14)
  Bottom Layer w5: R62.1@2558.6,-34.01 2571.21,-34.01 ccw(c2571.21,-28.95) 2576.28,-28.95 2576.28,29.51 ccw(c2570.9,29.51) 2570.9,34.89 R61.1@2558.6,34.89
  Bottom Layer w5.5: C154.2@2015.37,217.48 v1(2015.37,217.25) 2015.37,198.96 2028.23,186.1 2038.55,186.1 2050.69,198.24 2064.73,198.24 2066.66,196.31 2067.26,196.31 2069.19,198.24 C145.2@2071.84,195.59
  Bottom Layer w8: v1(2142.04,126.78) v1(2160.14,144.87) ; C136.2@2285.83,459.25 2286.8,458.28 v1(2286.8,452.49) 2287.53,451.76 2287.53,445.42 C127.2@2301.31,431.64 ; v1(2286.8,416.3) 2286.8,417.12 C127.2@2301.31,431.64 ; C127.2@2301.66,431.29 C127.2@2301.31,431.64 ; C127.2@2302.18,432.5 C127.2@2301.31,431.64
  Bottom Layer w10: v1(1828.72,197.1) ccw(c1850.37,197.1) 1850.37,175.46 1905.74,175.46 cw(c1905.74,171.8) 1909.4,171.8 1909.4,147.78 ccw(c1916.93,147.78) C122.1@1916.93,140.24 C122.1@1924.43,139.43 ; C140.2@2530.35,-60.3 R63.1@2530.35,-34.01 R62.1@2558.6,-34.01
  other v1: 1817.49,186.67 2069.66,199.16
VCCIO6: C144.2 R93.1 U1.1L4 U1.1L5 | length 267.6
  Bottom Layer w6: 2242.56,490.48 ccw(c2235.17,497.85) 2245.61,497.85 2245.61,528.57
  Bottom Layer w7: v1@2214.42,452.49 v1(2214.42,452.96) ; v1@2214.66,452.73 v1(2232.52,470.59) ; C144.2@2227.44,475.36 2229.14,477.06 2242.55,490.47 ; 2245.61,528.57 cw(c2267.58,528.57) 2252.07,544.13 2272.96,565.03 ccw(c2262.36,575.64) 2277.36,575.64 2277.36,612.08 cw(c2308.61,612.08) 2286.49,634.16 ; 2286.51,634.18 R93.1@2330.31,677.98
VCCIO_ACODEC: C17.2 C180.2 U1.1D13 U7.28 | length 1928.6
  Signal L1 w10: v1(1517.75,-181.49) 1517.75,-164.48 cw(c1537,-164.48) 1537,-145.23 ; v1(1523.76,-165.25) 1523.76,-158.47 cw(c1537,-158.47) 1537,-145.23 ; v1(2196.33,181.06) 2226.48,181.06 2226.54,181.06 cw(c2226.51,153.95) 2245.49,173.32 2245.55,173.25 2263.22,155.58 2263.27,155.53 cw(c2246.96,139.23) 2270.02,139.25 2270.02,139.18 2270.02,93.61 ccw(c2288.48,93.58) 2275.43,80.52 2384.32,-28.37 ccw(c2404.08,-8.62) 2404.08,-36.55 2418.6,-36.55 cw(c2418.6,-58.52) 2434.12,-42.98 2440.56,-49.42 cw(c2426.65,-59.18) 2443.64,-59.18 2443.64,-336.41 cw(c2416.94,-336.41) 2416.94,-363.11 2136.08,-363.11 cw(c2136.08,-337.99) 2110.96,-337.99 2110.96,-263.73 ccw(c2081.9,-263.73) 2081.9,-234.68 1676.14,-234.68 cw(c1676.14,-206.86) 1648.32,-206.86 1648.32,-165.85 ccw(c1627.7,-165.85) 1627.7,-145.23 1537,-145.23
  Bottom Layer w3.5: C17.2@1476.58,-221.01 C17.2@1480.08,-221.01 ; v1@1517.75,-183.33 v1(1517.75,-181.49)
  Bottom Layer w5: C17.2@1480.08,-221.01 v1@1517.75,-183.33
  Bottom Layer w8: v1(1517.75,-181.49) 1517.75,-180.79 1523.65,-174.9 U7.28@1523.65,-143.59
VCCIO_FLASH: C133.2 C134.2 C192.2 C193.2 C194.2 C195.2 C253.2 R87.2 R105.1 R106.1 R107.1 U1.1C13 U3.C6 U3.M4 U3.N4 U3.P3 U3.P5 | length 1238.9
  Top Layer w4: v1(2317.36,-190.02) C193.2@2320.06,-192.72 ; C193.2@2318.85,-185.51 C193.2@2320.35,-184.01
  Top Layer w8: C195.2@2245.1,-144.49 cw(c2239.67,-149.93) 2247.36,-149.93 v1(2247.36,-162.98) ; C194.2@2246.47,-104.83 2246.57,-104.94 C195.2@2246.57,-144.49
  Top Layer w10: C192.2@2197.6,-224.45 R107.1@2197.6,-184.31 ; R105.1@2281.79,-268.42 R106.1@2281.79,-227.4 2307.18,-227.4 ccw(c2307.18,-214.52) 2320.06,-214.52 C193.2@2320.06,-192.72 ; C193.2@2320.7,-181.16 2325.35,-176.51 2326.09,-176.51 2356.13,-146.47 C134.2@2409.7,-146.47 ; R87.2@2410.82,-185.07 C134.2@2410.82,-142.83 ; C134.2@2410.82,-142.48 C253.2@2410.82,-102.51
  Top Layer w12: v1(2197.6,-239.54) C192.2@2197.6,-225.45
  Signal L1 w10: v1@2176.33,-104.84 2176.33,-15.68 cw(c2207.17,-15.76) 2185.47,6.14 2242.31,62.98 2243.53,64.07 ccw(c2226.37,83.28) 2252.13,83.28 ; v1(2214.42,162.97) cw(c2214.42,131.88) 2236.4,153.86 2244.27,146 cw(c2225.29,127.02) 2252.13,127.02 2252.13,83.33
  PWR-2 w15: v1(2197.6,-239.54) 2197.6,-183.98 cw(c2218.6,-183.98) 2218.6,-162.98 v1(2247.36,-162.98)
  Signal L2 w10: v1(2176.19,-104.98) 2176.21,-94.25 cw(c2187.87,-94.25) 2187.87,-82.59 2227.94,-82.59 cw(c2227.94,-97.59) 2238.54,-86.98 cw(c1733.81,-591.82) 2238.87,-87.31 cw(c2218.17,-107.9) 2247.37,-107.9 2247.37,-131.21 ; v1(2247.36,-162.98) 2247.37,-131.21 ; v1(2317.36,-190.02) 2317.36,-185.56 ccw(c2293.67,-185.56) 2310.42,-168.81 2280.23,-138.62 ccw(c2262.3,-156.61) 2262.3,-131.21 2247.37,-131.21
  Bottom Layer w8: U3.P3@2156.27,-47.02 U3.N4@2175.96,-66.71 U3.M4@2175.96,-86.39 v1@2175.96,-104.98 ; U3.N4@2175.96,-66.71 U3.P5@2195.64,-47.02 ; v1(2197.6,-239.54) 2205.1,-239.54 cw(c2205.1,-249.77) 2215.33,-249.77 U3.C6@2215.33,-263.56
VCCIO_SD: C19.2 C107.2 U1.1F17 U7.29 | length 920.8
  Top Layer w8: v1(1493.32,-188.14) 1494.05,-188.87 1494.05,-190.14 1509.18,-205.27 1509.18,-206.51 1514.18,-211.51 1640.62,-211.51 1651.47,-200.66 1651.47,-161.53 1700.68,-112.32 v3(1700.68,-34.85)
  Signal L1 w7: v3@1700.7,-34.87 1735.92,0.36 1991.02,0.36 2005.01,14.35 2005.01,97.13 2016.48,108.6 2051.48,108.6 v1(2087.75,144.87)
  Bottom Layer w7: v1@1493.32,-187.84 1509.93,-170.25 U7.29@1509.93,-145.21
  Bottom Layer w8: v1(2087.75,144.87) C107.2@2088.9,143.73
VCCIO_WL: C77.1 C78.2 C150.2 C257.1 R9.1 R51.1 R94.1 R135.1 R136.1 R137.1 R138.1 R139.1 R140.2 U1.1E16 U17.34 X5.4 | length 1449.1
  Top Layer w8: v2(1153.78,205.5) 1167.05,192.23 R51.1@1239.21,192.23
  PWR-2 w5: 2087.2,90.59 2123.94,127.33 v1(2123.94,144.87)
  PWR-2 w10: v2(1616.4,350.93) 1701.34,350.93 2005.87,46.4 2043.01,46.4 2087.2,90.59
  Signal L2 w15: 1184.39,387.04 v2(1194.21,387.04) 1580.48,387.04 1616.4,351.13 v2(1616.4,350.93)
  Bottom Layer w7: X5.4@1035.06,611.76 1037.06,611.76 X5.4@1037.8,611.02
  Bottom Layer w10: R135.1@998.94,391.73 R136.1@1055.81,391.73 R137.1@1096.24,391.73 R138.1@1136.67,391.73 R139.1@1177.11,391.73
  Bottom Layer w20: R94.1@968.02,717.31 v2@968.02,726.31 ; v2@998.94,611.76 X5.4@1035.06,611.76
  other v1: 1184.24,727.79
  other v2: 998.94,404.23 994.94,611.76 1284.72,620.44 1284.72,638.09 968.02,726.4
VDD12: C258.2 C318.2 FB11.2 U18.21 U18.55 | length 568.8
  Top Layer w7.5: FB11.2@834.34,-365.8 826.28,-373.86 FB11.2@822.56,-373.86 830.62,-365.8 FB11.2@834.82,-365.8 ; C258.2@857.75,-357.42 v1(857.78,-348.23) U18.55@857.78,-311.81 ; U18.21@936.55,-23.77 C318.2@936.55,68.16 C318.2@936.55,68.39
  Top Layer w12: FB11.2@834.82,-365.8 843.77,-356.85 C258.2@857.65,-356.85
  Signal L1 w10: v1(857.78,-348.23) 857.78,-314.58 936.7,-235.66 v3(936.7,-7.17)
VDD_CPU: C44.1 C44.2 C46.2 C47.2 C48.2 C83.2 C84.2 C87.2 C91.2 C95.2 C99.2 C103.2 L2.2 R21.1 R21.2 U1.1C12 U1.1D11 U1.1D12 U1.1E11 U1.1E12 U1.1E13 U1.1F11 U1.1F12 U1.1F13 U1.1F14 U1.1G13 U5.A4 | length 1090.1
  Top Layer w10: v1(2142.04,199.16) v1(2160.13,217.25) v1(2196.33,253.44) v1(2214.42,235.35) ; v1(2142.04,235.35) v1(2178.23,199.16) v1(2196.33,217.25) ; v1(2178.23,235.35) v1(2196.33,217.25) ; U1.1C12@2232.52,181.06 v1(2214.42,199.16) ; v1(2196.33,217.25) v1(2214.42,199.16) ; v1(2196.33,217.25) v1(2214.42,235.35) ; v1(2214.42,199.16) v1(2232.52,217.25) v1(2214.42,235.35)
  Top Layer w13: v2(1767.35,555.15) 1767.35,576.53
  Top Layer w14: R21.2@1744.86,576.53 1767.35,576.53 C44.2@1787.36,576.53
  PWR-2 w5: v1(1587.53,620.88) 1694.12,620.88 1694.17,620.88 cw(c1694.15,603.47) 1706.47,615.76 1758.21,564.03 cw(c1466.48,254.28) 1767.09,555.42 v2(1767.35,555.15) 1893.41,429.09 ccw(c1902,437.68) 1902,425.54 ccw(c1902,437.68) 1910.58,429.09 1919.44,437.95
  Bottom Layer w7: U5.A4@1567.36,620.81 v1@1587.86,620.81
  Bottom Layer w10: v1(2142.04,235.35) v1@2158.4,218.99 ; C91.2@2155.36,203.91 C91.2@2160.11,199.16 ; v1(2160.13,217.25) v1(2178.23,235.35) ; v1@2218.35,203.09 v1(2232.52,217.25) ; C83.2@2231.46,182.12 v1(2214.42,199.16) 2180.91,232.67 2180.91,238.03 v1(2178.23,235.35) ; C87.2@2249.56,200.21 v1(2232.52,217.25) ; v1(2178.23,235.35) v1(2196.33,253.44) v1(2214.42,235.35) v1(2232.52,217.25)
  other v2: 1549.86,653.19 1572.86,653.19 1595.86,653.19 1699.86,653.19 1747.36,653.19 1767.36,653.19 1549.86,676.19 1572.86,676.19 1595.86,676.19
VDD_GPU: C60.1 C60.2 C62.1 C64.2 C89.2 C93.2 C97.2 C101.2 C105.2 L4.1 R19.1 R19.2 U1.1L8 U1.1L9 U1.1M7 U1.1M8 U1.1M9 U7.8 | length 1200
  Top Layer w10: v1(2160.14,434.4) v1(2142.04,416.3) ; v1(2142.04,416.3) v1(2160.14,398.21) v1(2142.04,380.11) v1(2123.94,398.21) v1(2142.04,416.3)
  PWR-1 w6: v1(1795.92,80.6) 1795.92,18.25 1781.81,4.13 v1(1710.97,4.13) 1687.57,4.13 1671.54,20.16 1671.54,77.25 1788.25,193.96 1788.25,417.63 1837.85,467.24 2024.31,467.24 2024.82,466.72
  Bottom Layer w5: C93.2@2093.78,468.07 2091.3,465.6 2091.3,452.87 ccw(c2100.79,452.87) 2094.08,446.16 C105.2@2133.6,406.63 ; C105.2@2133.1,406.93 C105.2@2138.98,391.59
  Bottom Layer w6: v1@1710.81,3.97 v1(1710.97,4.13)
  Bottom Layer w7: v1@1795.98,80.55 1824.58,80.55 1828.68,84.65 C60.2@1828.68,99.53
  Bottom Layer w8: U7.8@1686.51,3.81 v1@1710.65,3.81
  other v1: 1826.36,19.13 1842.36,19.13 1826.36,37.13 1842.36,37.13 1826.36,55.13 1842.36,55.13
VDD_LOGIC: C51.1 C51.2 C61.1 C63.2 C88.2 C92.2 C96.2 C98.2 C100.2 C104.2 C262.2 L3.1 R18.1 R18.2 R20.1 U1.1H7 U1.1H8 U1.1H9 U1.1H10 U1.1J7 U1.1J10 U1.1K7 U1.1K10 U1.1L7 | length 1589.4
  Top Layer w10: v1(2142.04,343.92) v1(2160.14,325.83) v1(2178.23,307.73) v1(2232.52,362.02) v1(2214.42,380.11) v1(2196.33,398.21) v1(2178.23,416.3)
  PWR-1 w4.5: v2(1961.01,-215.86) 2151.01,-215.86 2197.59,-262.44 2242.95,-262.44 2262.36,-243.03 2262.36,152.97 2242.31,173.02
  Bottom Layer w6: R18.1@1836.68,-225.97 1836.68,-241.97 ccw(c1845.24,-241.97) 1845.24,-250.53 1880.18,-250.53 ccw(c1880.18,-231.8) 1893.42,-245.05 1914.02,-224.45 cw(c1934.71,-245.1) 1934.71,-215.86 v2(1961.01,-215.86)
  Bottom Layer w8: v1@2181.18,413.36 2209.63,384.9 C262.2@2216.21,384.9 ; C96.2@2211.61,341.11 v1(2214.42,343.92) v1(2232.52,362.02)
  Bottom Layer w10: R20.1@1802.89,-184.42 R20.1@1802.89,-184.42 1820.14,-184.47 1820.19,-184.51 1820.23,-184.47 C51.1@1836.73,-184.47 ; C51.1@1836.68,-184.42 C51.1@1836.73,-184.47 ; R18.1@1836.82,-225.97 1836.82,-184.56 C51.1@1836.73,-184.47 ; v1(2160.14,325.83) v1(2142.04,343.92) 2142.83,343.92 C92.2@2178.62,308.12 ; v1(2178.23,307.73) C92.2@2179.02,307.73 ; v1(2178.23,416.3) 2185.97,408.56 C88.2@2187.55,408.56 ; C92.2@2181.76,304.67 2181.76,304.98 C92.2@2179.02,307.73 ; C96.2@2214.42,342.9 C96.2@2214.42,343.08 ; v1(2214.42,343.92) C96.2@2214.42,343.08 ; C96.2@2215.27,337.11 2215.27,334.37 2188.63,307.73 C92.2@2179.02,307.73 ; C262.2@2216.21,384.9 2232.52,368.6 v1(2232.52,362.02) ; C92.2@2178.62,308.12 C92.2@2179.02,307.73 ; C92.2@2178.62,308.12 v1(2196.33,325.83) 2196.67,326.17 2197.7,326.17 2213.52,341.99 2213.52,342.53 2214.07,343.08 C96.2@2214.42,343.08
  Bottom Layer w15: R18.2@1873.68,-225.97 C51.2@1873.68,-184.42 1873.68,-163.65 cw(c1916.36,-163.65) C63.2@1886.18,-133.47
  other v1: 1824.36,-153.91 1839.36,-153.91 1854.36,-153.91 1824.36,-139.23 1839.36,-139.28 1854.36,-139.28
VDD_NPU: C69.2 C70.2 C72.1 C72.2 C90.2 C94.2 C102.2 C106.2 L6.1 R26.1 R26.2 U1.1G15 U1.1H14 U1.1H15 U1.1J14 U1.1J15 U7.64 | length 1663.8
  Top Layer w10: v1(2105.85,199.16) v1(2087.75,217.25) ; v1(2087.75,217.25) v1(2105.85,235.35) v1(2087.75,253.44) v1(2069.66,235.35) v1(2087.75,217.25)
  PWR-2 w7: v1(1546.77,533.62) 1546.77,416.3 1589.98,373.09 1702.52,373.09 2005.64,69.97 2013.4,69.97 2023.37,79.95
  Signal L2 w7: v1(1546.77,533.62) 1546.27,533.12 1546.27,486.06 1554.84,477.49 1631.31,477.49 1640.32,486.5 v1(1640.32,535.1)
  Bottom Layer w7: v1(1546.77,533.62) 1546.27,533.12 1546.27,300.66 1560.68,286.24 1560.68,164.61 1573.27,152.02 1600.12,152.02 1606.25,145.89 1606.25,125.4 U7.64@1606.39,125.27
  Bottom Layer w10: v1(1640.32,535.1) 1640.46,534.96 1640.46,513.86 R26.1@1641.79,512.53 ; C72.2@1641.79,476.66 C72.2@1641.79,480.66 R26.1@1641.79,512.53 ; R26.1@1641.79,516.53 R26.1@1641.79,512.53 ; v1(2069.66,235.35) 2070.95,234.05 C94.2@2090.83,234.05 ; v1(2087.75,253.44) 2090.83,250.37 C94.2@2090.83,234.05 ; v1@2104.7,200.31 v1(2087.75,217.25) 2087.75,230.98 C94.2@2090.83,234.05
  other v1: 1592.79,494.73 1592.79,512.23 1592.79,529.73 1610.29,529.73 1592.79,547.23 1610.29,547.23
VDDA0V9_IMAGE: C13.2 C148.2 C149.1 C152.2 C160.2 C162.2 C171.2 C173.2 U1.1H17 U1.1N9 U1.1N10 U1.1N13 U1.1N14 U1.1P11 U7.23 | length 2500.4
  Top Layer w7: U1.1P11@2051.57,398.2 v1(2087.75,398.21)
  Signal L1 w5: v1(2015.37,325.83) 2015.37,313.92 cw(c2000.37,313.92) 2010.99,303.32 1987.2,279.53 ccw(c1994.27,272.46) 1984.27,272.46 1984.27,270.65 ccw(c1994.27,270.65) 1987.2,263.58 2047.17,203.61 cw(c2036.56,193) 2051.56,193 v1(2051.56,181.06)
  PWR-1 w10: v2(1408.49,674.57) 1408.49,708.66 1420.47,720.64 cw(c1431.07,710.03) 1431.07,725.03 1591.14,725.03 cw(c1591.14,710.03) 1601.74,720.64 1631,691.38 ccw(c1650.13,710.51) 1650.13,683.46 1774.3,683.46 1788.27,669.49 1788.27,597 1775.29,584.03 1753.21,584.03 1743.36,574.17 v2(1743.36,555.15)
  PWR-2 w10: v2(1408.49,674.57) 1442.3,640.76 1442.3,331.59 1618.84,155.05 1618.84,-128.48 1598.08,-149.25 ccw(c1611.09,-162.25) 1592.7,-162.25 v1(1592.7,-169.97) ccw(c1610.2,-169.97) 1610.2,-187.47 v1(1620.26,-187.47)
  Bottom Layer w4.1: U7.23@1592.61,-145.21 U7.23@1592.65,-145.25
  Bottom Layer w6: v1(1620.26,-187.47) 1621.23,-188.44 1628.36,-188.44 1663.68,-223.77 1663.68,-224.97 1669.68,-230.97 C13.2@1673.18,-230.97 ; v1(2033.47,343.92) C162.2@2039.47,349.92
  Bottom Layer w7: C160.2@2047.49,400.16 C160.2@2048.49,399.16 ; C160.2@2049.19,400.06 2058.4,390.85
  Bottom Layer w7.5: C162.2@2038.29,351.77 2038.29,354.82 2033.54,359.58 2033.54,365.79 2066.06,398.3 2087.66,398.3 v1(2087.75,398.21)
  Bottom Layer w8: v1@1592.65,-169.84 U7.23@1592.65,-145.25 ; v2(1743.36,555.15) 1743.36,546.39 ccw(c1755.06,546.4) 1752.99,534.89 1754.36,534.77 1808.89,534.77 cw(c1808.89,502.85) 1831.46,525.42 1972.68,384.2 1988.04,384.2 1989.51,385.68 2011.45,385.68 2033.44,363.68 v1(2033.47,343.92) ; C148.2@1743.36,574.03 cw(c1745.86,574.03) C148.2@1745.86,576.53 ; v1(2015.37,325.83) v1(2033.47,343.92)
  Bottom Layer w10: C149.1@2087.89,398.07 2105.85,416.02 v1(2105.85,416.3)
  Bottom Layer w15: v2(1743.36,555.15) C148.2@1743.36,574.03 ; C148.2@1745.86,576.53 C173.2@1787.36,576.53
VDDA0V9_PMU: C16.2 C119.1 C124.2 C131.2 C132.1 U1.1N16 U1.1P17 U7.20 | length 2736.1
  PWR-1 w10: v2(1416.19,765.98) 1426.66,755.5 ; 1426.69,755.48 ccw(c1451.96,780.8) 1451.96,745.03 1595.29,745.03 cw(c1595.29,721.94) 1611.61,738.27 1611.65,738.23 1639.12,710.77 ccw(c1656.89,728.54) 1656.89,703.4 1784.53,703.4 1806.54,681.39 1806.54,553.56 1787.8,534.83 1718.68,534.83 v2(1698.36,555.15)
  PWR-2 w10: v2(1416.19,765.98) 1481.07,701.1 1481.07,350.03 1664.86,166.24 1664.86,-151.24 1646.78,-169.31 1646.78,-203.25 1687.53,-244 1687.53,-308.8 1701.21,-322.47 v2(1728.85,-322.47)
  Signal L2 w8: v1(1939.85,395.03) 1972.26,362.62 1972.34,362.54 cw(c1955.1,345.35) 1979.45,345.35 v1@1979.45,289.9 ; v1(1942.99,289.64) v1(1979.18,289.64) v1(1942.99,289.64)
  Bottom Layer w6: U7.20@1633.95,-145.21 1633.95,-176.82 1666.73,-209.6
  Bottom Layer w7: v1@1943.09,289.73 1973.42,289.73 1975.52,287.64 C131.2@1977.49,287.64
  Bottom Layer w8: v2(1698.36,555.15) 1698.35,536.19 ccw(c1717.54,536.19) 1717.54,517 1755.63,517 cw(c1755.63,479.45) 1782.18,506 1839.12,449.06 C124.2@1869.01,419.17 1894.65,393.53 ccw(c1912.76,411.64) 1912.72,386.03 1928.95,386.03 C119.1@1938.44,388.45
  Bottom Layer w10: 1669.12,-209.33 1690.04,-209.33 1711.68,-230.97 C16.2@1715.18,-230.97 1722.68,-234.67 1739.21,-251.19 cw(c1725.5,-264.86) 1744.86,-264.88 1744.86,-306.46 v2(1728.85,-322.47)
  Bottom Layer w15: v2(1698.36,555.15) C132.1@1698.35,574.03
VDDA_0V9: C15.2 C121.1 C126.2 C135.2 C138.2 C139.2 C143.2 U1.1H5 U1.1J4 U1.1J17 U1.1K16 U7.21 | length 2646.7
  Top Layer w10: v1@1620.26,-169.14 C15.2@1620.26,-140.76
  PWR-1 w10: v2(1386.28,765.98) 1386.28,767.36 cw(c1403.99,767.36) 1403.99,785.06 1581.89,785.06 1581.96,785.06 cw(c1581.96,741.93) 1612.51,772.38 1641.36,743.53 1642.73,742.16 ccw(c1670.16,769.58) 1670.16,730.79 2260.05,730.79 cw(c2260.05,693.71) 2286.26,719.95 2286.32,719.89 v1(2348.06,658.14)
  PWR-2 w10: v2(1386.28,765.98) 1461.68,690.58 1461.68,340.71 1642.83,159.56 1642.83,-147.4 v1(1620.26,-169.97)
  Bottom Layer w4.1: v1@1620.17,-169.88 v1@1620.21,-169.84 ; U7.21@1620.17,-145.21 U7.21@1620.21,-145.25
  Bottom Layer w5.7: 2253.72,473.7 ccw(c2268.72,473.7) 2258.11,463.1 ; 2253.72,473.8 2253.72,487.34 cw(c2259.42,487.34) 2254.02,489.17 2255.01,492.08 ccw(c2231.01,500.24) 2255.03,492.16 2256.03,495.1 2256.03,522.76 ; 2258.12,463.1 2264.11,457.1 cw(c2253.51,446.49) 2268.51,446.59 ; C126.2@2268.51,434.5 2268.51,446.49 ; 2268.51,446.49 ccw(c2253.51,446.49) 2268.51,446.59 ; 2268.51,446.49 2268.51,446.59
  Bottom Layer w6: 2256.71,522.76 2257.71,523.76
  Bottom Layer w7: C135.2@2032.61,233.14 C135.2@2033.14,233.68 ; v1(2033.47,199.16) 2033.47,231.38 2033.14,231.7 C135.2@2033.14,233.68 ; v1(2033.47,235.35) 2033.14,235.02 C135.2@2033.14,233.68 ; C135.2@2033.86,234.39 C135.2@2033.14,233.68
  Bottom Layer w8: v1@1620.21,-169.84 U7.21@1620.21,-145.25 ; C121.1@1982.93,248.55 2020.27,248.55 v1(2033.47,235.35) ; 2257.71,523.76 2257.71,523.88 2275.62,541.8 ; C126.2@2262.71,435.52 2264.61,433.62 2268.71,429.52 v1(2268.71,398.21) ; C143.2@2316.3,516.85 2288.37,544.78 ; C139.2@2360.31,647.98 2387.81,620.48 2371.75,604.42 cw(c2361.14,615.03) 2361.14,600.03 2334.07,600.03 ccw(c2334.07,585.03) 2323.47,595.64 2283.91,556.08 2283.91,549.97 ; 2283.91,549.97 2283.8,549.97 2275.64,541.81 cw(c2282.83,534.59) 2282.83,544.78 2288.37,544.78 ; 2283.91,549.97 2283.91,549.24 2288.37,544.78
  Bottom Layer w10: C126.2@2264.61,433.62 2265.39,434.4 v1(2268.71,434.4) ; v1(2348.06,658.14) 2358.23,647.98 C139.2@2360.31,647.98
VSEL_EXTDCDC: R13.1 U5.A1 | length 45.6
  Bottom Layer w7: U5.A1@1567.36,573.56 R13.1@1612.93,573.56
WIFI_HOST_WAKE: U1.B34 U17.16 | length 2561.9
  Top Layer w4: v1(815.82,371.85) 943.32,371.85 cw(c943.32,358.66) 956.51,358.66 U17.16@956.51,279.73 ; v1(1426.96,-439.08) 1653.29,-439.08 1710.97,-381.41 1710.97,-308.54 1763.14,-256.37 1895.99,-256.37 1962.68,-189.68 1962.68,-128.5 1981.52,-109.66 2139.67,-109.66 2170.67,-78.67 2170.67,-38.47 ccw(c2155.61,-38.47) 2166.28,-27.84 ; U1.B34@2158.75,-13.81 2158.75,-16.15 ccw(c2168.78,-16.15) 2161.68,-23.24 2166.26,-27.82
  Signal L2 w4: v1(815.82,371.85) 815.82,182.2 914.52,83.5 1072.91,83.5 1100.39,56.02 1100.39,-347.49 1191.98,-439.08 v1(1426.96,-439.08)